# Altium PCB BMS042A_PCB.PcbDoc (part 4 of 5)
Units mil, origin at the board's own origin, x right, y up, seen from the top; angles counter-clockwise.
Board outline 4409.45 x 3307 mil, 6 copper layers (Top Layer, Layer 2 - PGND, Layer 3, Layer 4, Layer 5 - PGND, Bottom Layer), stack 60.8 mil thick; 273 components, 77 nets, 544 pads, 927 vias.
Unrouted connection lines stored in the file: 219.
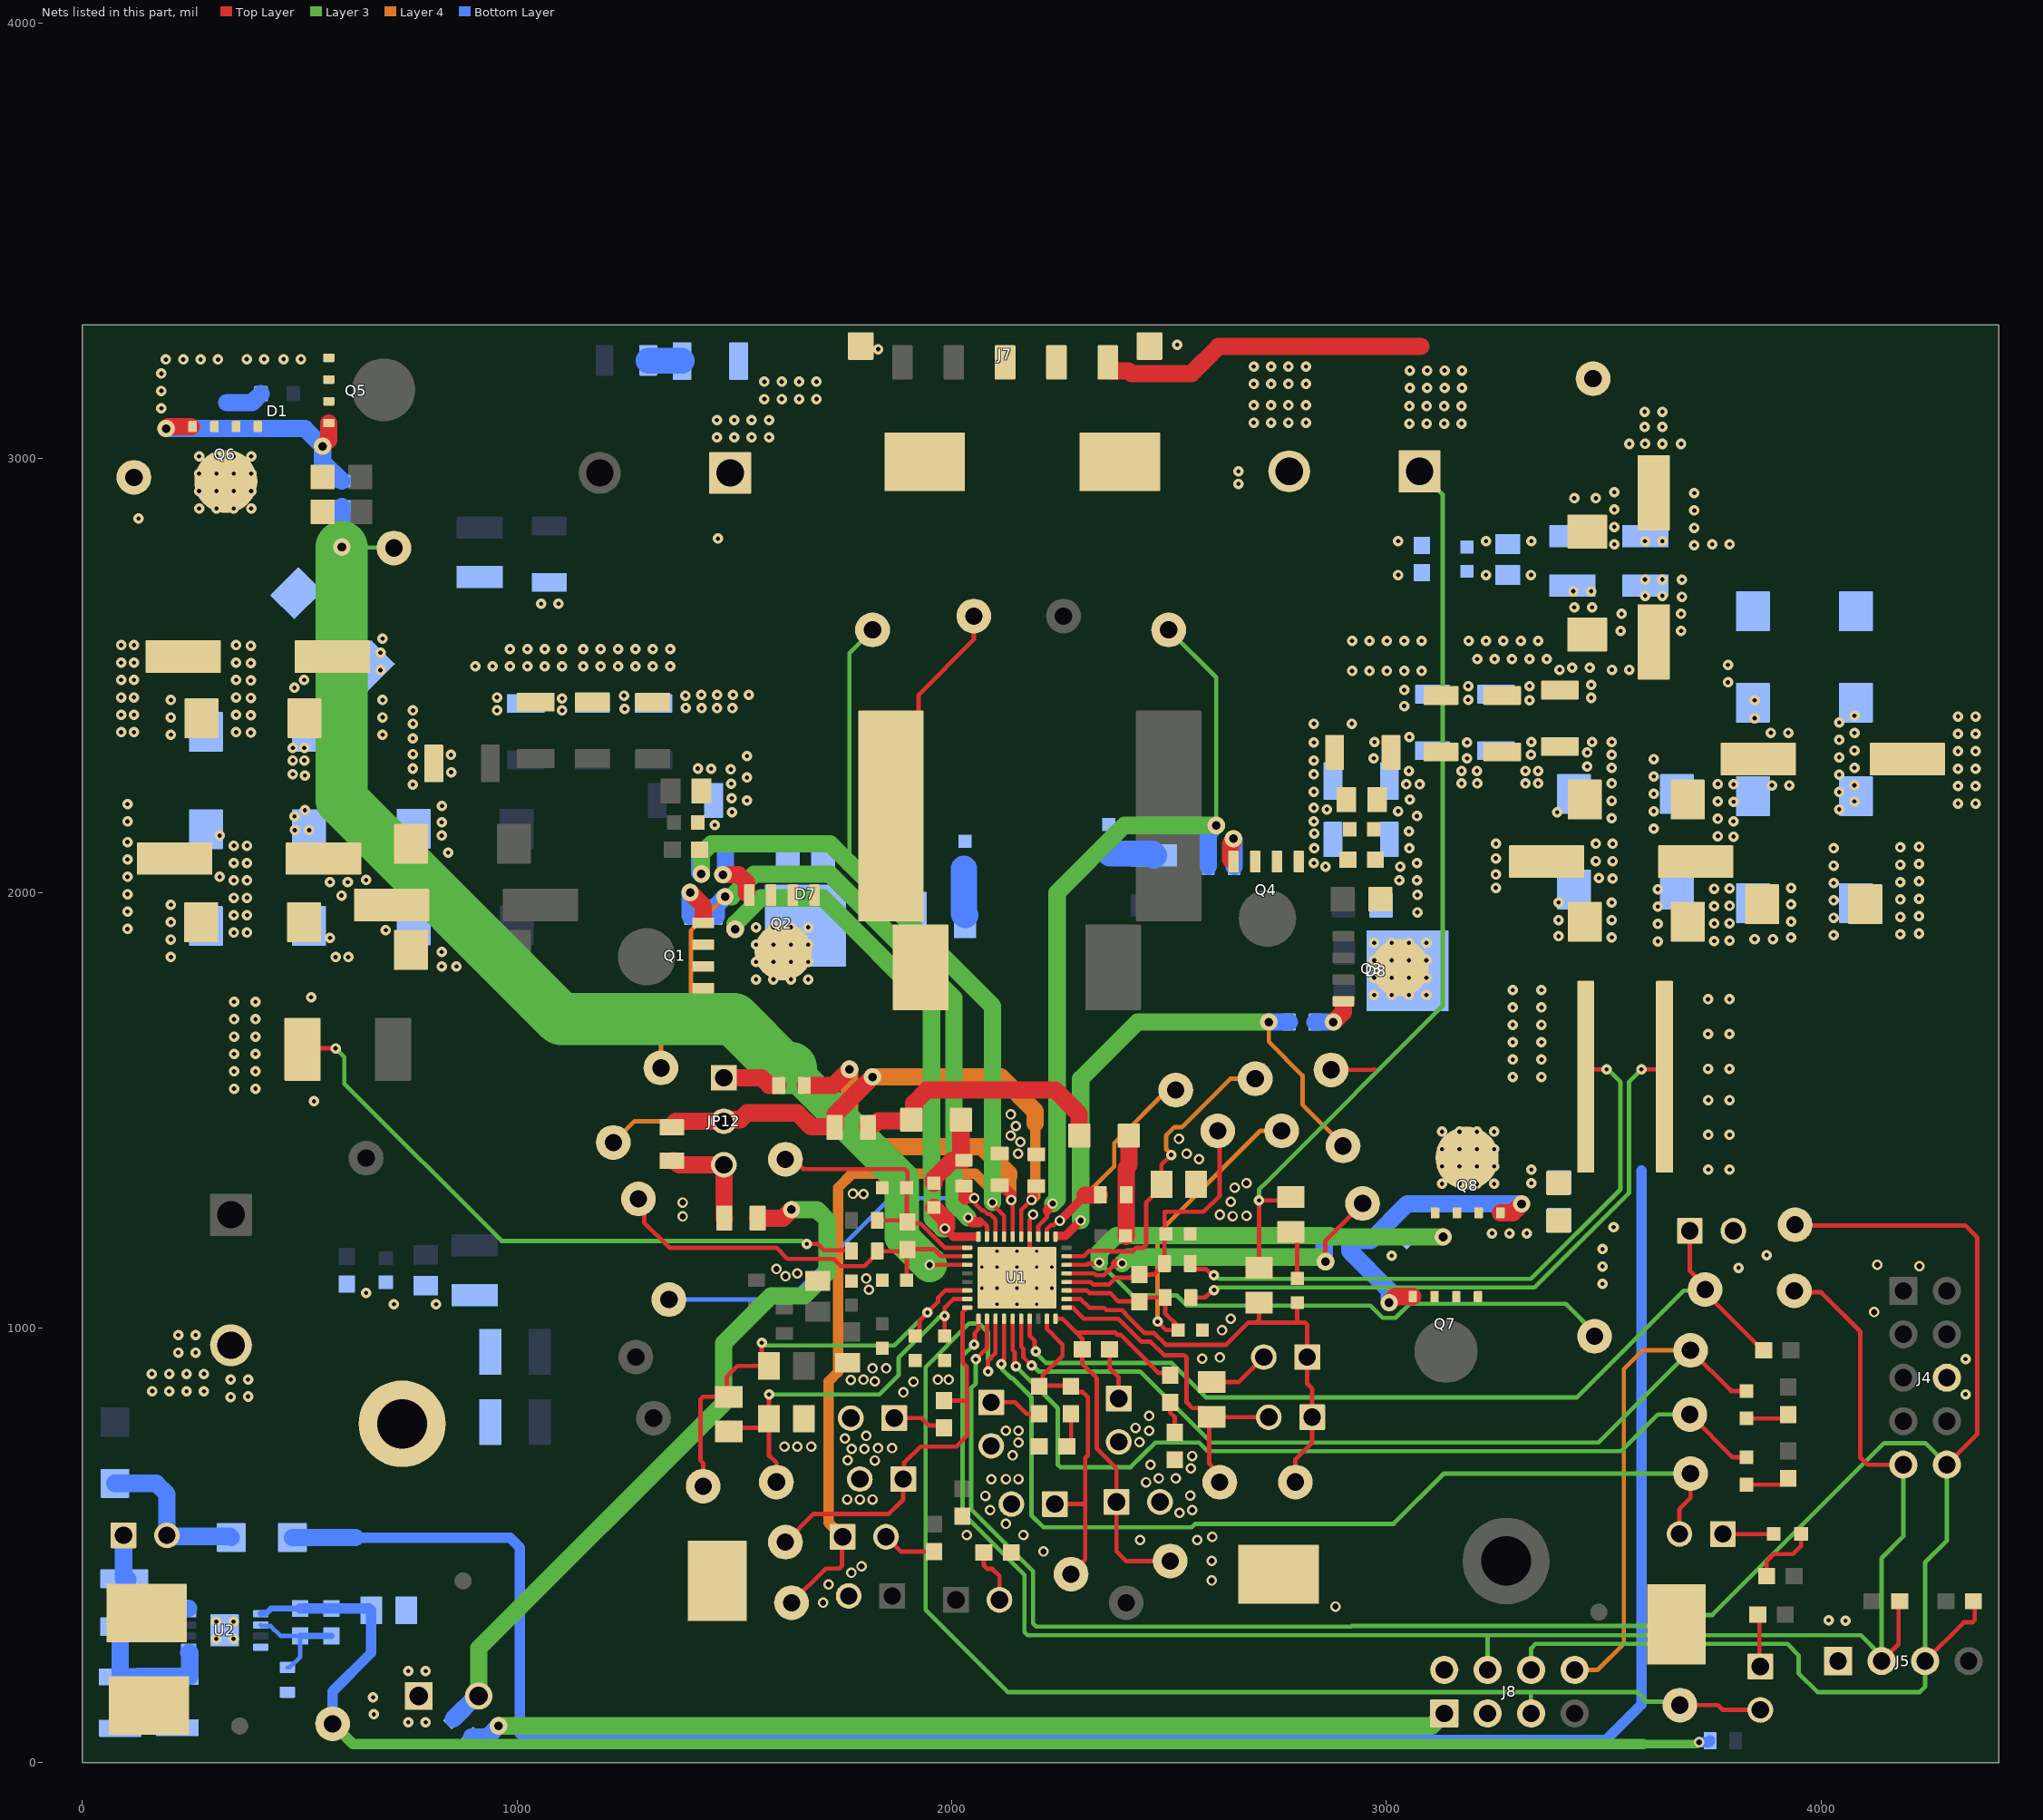
[diagram p6: the nets of this part, all layers, seen from the top]

## Via types
v1: diameter 24, hole 10, Top Layer to Bottom Layer, tented both sides, 653 vias
v2: diameter 24, hole 9.8, Top Layer to Bottom Layer, tented both sides, 132 vias
v3: diameter 24, hole 14, Top Layer to Bottom Layer, tented both sides, 105 vias
v4: diameter 40, hole 20, Top Layer to Bottom Layer, tented both sides, 21 vias
v5: diameter 19.68, hole 7.87, Top Layer to Bottom Layer, tented both sides, 16 vias

## Nets (pads, with @x,y where several pads share a name; then routed paths per layer and width w, separated by ;. In a path a pad name is that pad's centre, name@x,y a point inside that pad or via, vN(x,y) a via of type N, cw(c..) or ccw(c..) an arc to the next point about the centre after c; other vN are vias at no path point) (continued)
BTST2: (continued)
  Layer 4 w10: v3(2248.85,1246.42) 2249.46,1246.42 2373.81,1370.77 2373.81,1424.57 TP28.1@2506.82,1557.58
DRV_SUP: C26.1 JP12.2 R120.2 R300.2 TP15.1 U1.23 | length 1571
  Top Layer w9.84: U1.23@2159.86,1209.73 2159.86,1270.99 2183.12,1294.24 v3(2183.56,1294.24)
  Top Layer w10: R300.2@1362.06,1471.75 R300.2@1365.27,1468.54
  Top Layer w24: v3(2183.56,1294.24) 2185.94,1296.63 2185.94,1322.31 2189.69,1326.05 C26.1@2194.61,1326.05
  Top Layer w40: R300.2@1362.06,1471.75 1365.31,1475 JP12.2@1476,1475 1479.65,1478.65 1513.79,1478.65 1529.31,1494.16 1644.93,1494.16 1676.77,1462.32 1729.45,1462.32 1730.75,1461.02 R120.2@1730.75,1460.93 1732.05,1462.23 1732.05,1491.05 v4(1818,1577)
  Layer 4 w10: TP15.1@1221.64,1426.18 1270.46,1475 JP12.2@1476,1475
  Layer 4 w24: v3(2183.56,1294.24) 2192.08,1302.77 2192.08,1469.92
  Layer 4 w40: v4(1818,1577) 2113,1577 2192.08,1497.92 2192.08,1469.92
EXT_DRV: J6.2 R45.1 R68.2 | length 1729.9
  Top Layer w40: R45.1@1553.76,1252.02 1612,1252.02 v4(1631.64,1271.66)
  Layer 3 w40: J6.2@911.9,153 911.9,262.47 1475.63,826.2 1475.63,964.79 1583.9,1073.07 1660.07,1073.07 1713.85,1126.85 1713.85,1248.23 1690.42,1271.66 v4(1631.64,1271.66)
  Bottom Layer w40: R68.2@853.87,100.15 906.71,153 J6.2@911.9,153
FB: C25.2 JP1.1 JP2.1 R28.1 TP24.1 U1.12 | length 1122.4
  Top Layer w9.84: U1.12@2264.2,1066.03 2296.84,1066.03 2317.1,1045.77
  Top Layer w10: 2317.1,1045.77 2350.51,1045.77 2355.68,1040.6 2392.48,1040.6 2398.34,1034.74 2398.34,1033.7 2444.21,987.83 2465.59,987.83 2492.5,960.92 2631.11,960.92 2682.31,1012.12 2794.93,1012.12 ; 2702.18,1013.83 2707.04,1018.69 R28.1@2707.04,1058.12 ; TP24.1@2790.6,645.13 2790.6,697.14 2829.35,735.89 JP2.1@2829.35,794.25 2829.35,859.69 2817.87,871.17 JP1.1@2817.87,932.59 2817.87,1006.97 2812.72,1012.12 2794.93,1012.12 ; C25.2@2794.93,1057.69 2794.93,1012.12 ; JP1.1@2799.74,931.71 JP1.1@2802.24,929.21 ; JP2.1@2804.99,816.4 2806.24,815.15 JP2.1@2806.24,797.25 ; JP2.1@2811.21,797.25 JP2.1@2813.71,794.75
FBG: JP2.2 R64.1 TP42.1 U1.11 | length 796.8
  Top Layer w9.84: U1.11@2264.2,1046.35 2278.83,1046.35 2285.6,1039.58
  Top Layer w10: 2285.6,1039.56 2304.4,1020.76 2383.22,1020.76 2435.99,967.99 2457.37,967.99 2488.49,936.87 2534.41,936.87 2540.26,931.01 2540.26,828.53 2553.44,815.35 2577.98,815.35 R64.1@2597.98,795.35 ; TP42.1@2616.61,644.7 2616.61,663.64 2592.07,688.18 2592.07,789.45 R64.1@2597.98,795.35 ; JP2.2@2729.35,794.25 2608.43,794.25 2603.76,789.58 R64.1@2597.98,795.35
FSW_SYNC: JP8.1 R36.2 TP16.1 U1.36 | length 923.9
  Top Layer w9.84: 2024.89,994.22 2024.89,1035.39 U1.36@2035.85,1046.35
  Top Layer w10: TP16.1@1617.5,506.86 1682.64,572 1855.56,572 1888.66,605.1 JP8.1@1888.66,651.96 1890.37,653.67 1890.37,688.82 1928.31,726.76 2010.62,726.76 2035.13,751.27 2035.13,832.09 ; R36.2@1982.27,832.69 2034.53,832.69 2035.13,832.09 ; 2024.89,994.22 2024.89,920.35 2035.13,910.12 2035.13,832.09
HIDRV1: R8.2 TP25.1 U1.27 | length 1801.7
  Top Layer w9.84: 2062.87,1243.38 2065.72,1240.53 2075.36,1240.53 2081.12,1234.77 U1.27@2081.12,1209.73
  Top Layer w24: v3(2037.87,1253.04) 2047.53,1243.38 2062.87,1243.38
  Layer 3 w40: v4(1478.64,1991.46) 1493.85,1991.46 1545.57,2043.18 1720.01,2043.18 2005,1758.19 2005,1285.91 v3(2037.87,1253.04)
  Layer 4 w10: TP25.1@1334.8,1620.85 1344.61,1611.04 TP25.1@1331.21,1597.65 1331.21,1674.62 1400.23,1743.63 1400.23,1913.04 v4(1478.64,1991.46)
  Bottom Layer w40: R8.2@1458.05,1946.44 1458.05,1970.87 v4(1478.64,1991.46)
HIDRV2: R3.2 TP27.1 U1.19 | length 1283
  Top Layer w20: 2243.68,1211.54 2261.63,1211.54 v3(2296.71,1246.62)
  Layer 3 w40: v3(2296.71,1246.62) 2296.71,1572.35 2427.36,1703 v4(2729.35,1703)
  Layer 4 w10: v4(2729.35,1703) 2729.35,1657.76 2807,1580.12 2807,1513 2900.2,1419.8 TP27.1@2900.2,1418.18
  Bottom Layer w40: v4(2729.35,1703) R3.2@2776.71,1703
ICHG: JP3.1 R67.2 R201.2 TP17.1 U1.9 | length 818.6
  Top Layer w9.84: U1.9@2218.92,1020.76 2218.92,998.13 2233.95,983.1
  Top Layer w10: 2233.95,983.1 2233.95,982.56 2254.86,961.65 2254.86,935.65 2209.39,890.18 2209.39,880.55 2195.69,866.85 2268.04,866.85 R201.2@2268.04,865.87 ; JP3.1@2237.34,594.5 2306.98,594.5 2307.09,594.4 ; R201.2@2274.6,865.44 2287.57,852.47 2301.23,852.47 2313.22,840.48 2313.22,706.32 2307.09,700.18 2307.09,594.4 ; TP17.1@2284.51,433.15 TP17.1@2274.6,433.15 2274.6,434.6 2306.98,466.98 2306.98,478.33 2307.09,478.44 2307.09,594.4
ILIM_HIZ: JP11.1 R66.2 R200.2 TP7.1 U1.10 | length 992.6
  Top Layer w9.84: U1.10@2238.6,1020.76 2254.86,1020.76
  Top Layer w10: 2254.86,1020.76 2286.93,988.68 ; R200.2@2501.47,890.18 R200.2@2502.47,891.19 2497.61,896.05 2476.55,896.05 2428.93,943.67 2389.09,983.5 2381.65,983.5 2376.48,988.68 2286.93,988.68 ; TP7.1@2502.47,463.57 2401.38,463.57 2379.24,485.7 JP11.1@2379.24,599.34 2379.24,676.35 2333.89,721.7 2333.89,883.96 2300.27,917.58 R66.2@2300.27,949.96 2300.27,975.34 2286.93,988.68
LODRV1: R20.1 TP43.1 U1.25 | length 2033.8
  Top Layer w9.84: U1.25@2120.49,1209.73 2120.49,1257.45
  Top Layer w10: v3(2093.81,1288.14) 2093.81,1284.35 2100.81,1277.35 2100.81,1277.02 2120.38,1257.45
  Layer 3 w10: 1764.67,2069.01 1764.67,2551.86 TP43.1@1818,2605.19
  Layer 3 w40: v4(1424.04,2043.72) 1424.04,2090.09 1447.47,2113.52 1720.16,2113.52 1764.67,2069.01 2093.81,1739.87 v3(2093.81,1288.14)
  Bottom Layer w40: R20.1@1420.47,2096 1420.47,2047.28 v4(1424.04,2043.72)
LODRV2: R17.1 TP44.1 U1.21 | length 1835.6
  Top Layer w9.84: U1.21@2199.23,1209.73 2199.23,1234.66 2219.18,1254.6 2219.18,1268.14
  Top Layer w20: 2219.18,1268.14 2219.18,1271.35 2232.49,1284.66 v3(2232.49,1285.74)
  Layer 3 w10: TP44.1@2499.14,2605.19 2608.41,2495.91 v4(2608.41,2155.29)
  Layer 3 w40: v3(2232.49,1285.74) 2242.49,1295.74 2242.49,2000.67 2397.1,2155.29 v4(2608.41,2155.29)
  Bottom Layer w40: R17.1@2590.44,2061.1 2590.44,2137.31 v4(2608.41,2155.29)
MODE: R32.2 TP20.1 U1.17 | length 744.7
  Top Layer w9.84: U1.17@2264.2,1164.46 2280.97,1164.46 2303.73,1164.46 2316.29,1177.02 2365.29,1177.02 2366.82,1175.49 2415.82,1175.49 2424.47,1184.14 2441.09,1184.14
  Top Layer w10: 2441.09,1184.14 2447.19,1190.24 2447.19,1288.19 2482.5,1323.5 R32.2@2482.5,1330 2482.5,1375 v1(2505,1397.5)
  Layer 4 w10: v1(2505,1397.5) 2505,1398.81 2493.45,1410.36 2493.45,1443.22 2511.38,1461.16 2529.07,1461.16 2640.75,1572.84 TP20.1@2698.25,1572.84 ; TP20.1@2711.17,1596.51 TP20.1@2717.96,1603.3
NetC9_1: C9.1 D1.1 Q5.1 Q5.2 Q5.3 Q6.1 Q6.2 Q6.3 | length 86.5
  Bottom Layer w40: C9.1@333,3128 390.78,3128 D1.1@411.09,3148.31
  other v1: 182,3115 182,3155 182,3195 192.54,3227.16 232.54,3227.16 272.54,3227.16 312.54,3227.16 378.32,3228 418.32,3228 463.16,3228 503.16,3228
NetC9_2: C9.2 D1.3 Q5.4 Q6.4 R12.2 | length 594
  Top Layer w40: v4(193,3068.28) 197.69,3072.97 Q6.4@250.46,3072.97 ; v4(553.08,3027.53) 567.32,3041.77 Q5.4@567.32,3080.97
  Bottom Layer w40: v4(193,3068.28) 512.34,3068.28 v4(553.08,3027.53) 553.08,2991.66 R12.2@597.22,2947.53
NetC12_2: C12.2 D3.1 R13.2 | length 193.2
  Top Layer w40: C12.2@1958.93,1332.66 1958.93,1342.75 1988.46,1372.27 2001.4,1385.21 R13.2@2028.2,1385.21 2021.36,1392.05 D3.1@2021.36,1478.65
NetC13_1: C13.1 R10.1 | length 75.8
  Bottom Layer w60: R10.1@1303.02,3224.42 C13.1@1378.86,3224.42
NetC14_1: C14.1 R14.1 | length 108.4
  Bottom Layer w60: C14.1@2028.15,2056.17 2028.15,1951.93 R14.1@2031.09,1949
NetC15_1: C15.1 R15.1 | length 109.7
  Bottom Layer w60: C15.1@2359.78,2095.5 2364.7,2090.58 2461.18,2090.58 R15.1@2465.59,2086.18
NetC18_1: C18.1 D2.1 R23.2 | length 237
  Top Layer w24: C18.1@2399.65,1212.02 C18.1@2401.42,1210.25
  Top Layer w40: C18.1@2401.42,1210.25 2401.42,1367.7 2407.6,1373.88 D2.1@2407.6,1442.17
NetC25_1: C25.1 R59.1 | length 113
  Top Layer w10: R59.1@2780.2,1220.61 2794.93,1205.88 C25.1@2794.93,1113.69
NetC33_2: C33.2 C49.2 R46.2 U2.5 U2.8 | length 507.7
  Bottom Layer w40: R46.2@87.51,310.73 C33.2@87.51,196.95 87.82,197.27 127.73,197.27 128.59,198.13 C49.2@218.68,198.13 247.19,198.13 247.5,198.44 247.5,252.5 247.12,252.88 244.73,252.88 ; R46.2@96.65,312.38 98.31,310.73 165.14,310.73 189.56,335.15 189.56,351.09 193.16,354.69 244.73,354.69
NetC36_1: C36.1 Q7.4 Q8.4 R9.1 | length 728.8
  Top Layer w40: v4(3006.07,1057.76) 3020.24,1071.93 Q7.4@3060.7,1071.93 ; Q8.4@3262,1264.46 3290.46,1264.46 v4(3311,1285)
  Bottom Layer w40: v4(3006.07,1057.76) 3006.07,1086.57 2915.79,1176.85 R9.1@2915.79,1201.2 2964.02,1201.2 3047.82,1285 v4(3311,1285)
NetC50_2: C50.2 R48.1 R49.2 U2.2 | length 261.3
  Bottom Layer w10: U2.2@410.51,316.58 412.99,314.1 433.4,314.1 456.12,291.38 R48.1@501.51,291.38 501.51,243.2 477.03,218.72 R49.2@472.11,218.72
  Bottom Layer w14: R48.1@501.51,291.38 C50.2@573.69,291.38
NetC201_1: C201.1 R201.1 | length 79.9
  Top Layer w10: C201.1@2264.53,726.76 2274.6,736.82 R201.1@2274.6,802.45
NetC202_1: C202.1 R200.1 | length 73.2
  Top Layer w10: R200.1@2502.47,828.2 2502.47,804.99 2513.26,794.2 C202.1@2513.26,759.46
NetD2_2: D2.2 D3.2 R120.1 | length 614.8
  Top Layer w40: R120.1@1807.52,1460.93 1807.52,1468.18 1808.82,1469.48 1824.17,1469.48 1830.95,1476.26 D3.2@1903.01,1476.26 ; D3.2@1905.22,1478.65 1912.78,1486.21 1912.78,1516.42 1943.03,1546.68 2238.12,1546.68 2293.01,1491.79 2293.01,1447.33 D2.2@2298.6,1441.74
NetD4_1: D4.1 JP15.1 | length 127.5
  Top Layer w10: JP15.1@3774,525.56 D4.1@3890.91,525.56 D4.1@3898.4,533.05
NetD4_2: D4.2 R50.1 | length 155.1
  Top Layer w10: R50.1@3874.55,429 3874.55,462.5 3891.41,479.36 3935.25,479.36 3953.9,498.01 D4.2@3953.9,525.56
NetD5_2: D5.2 R51.1 | length 116.7
  Top Layer w10: D5.2@3828,639.01 3910.86,639.01 3924.56,652.71 R51.1@3924.56,653.6 ; R51.1@3928.67,649.49 R51.1@3938.26,659.08
NetD6_2: D6.2 R52.1 | length 99.7
  Top Layer w10: D6.2@3828,791.5 3915,791.5 R52.1@3924,800.5
NetD9_1: D9.1 D10.1 JP16.2 | length 374.7
  Bottom Layer w40: D10.1@75,642.03 170.47,642.03 195,617.5 JP16.2@195,522.5 197.5,520 340,520 D9.1@342.5,517.5
NetJP1_2: JP1.2 R64.2 | length 143.6
  Top Layer w10: R64.2@2597.98,875.35 2660.63,875.35 JP1.2@2717.87,932.59
NetJP4_1: JP4.1 R67.1 | length 121.9
  Top Layer w10: JP4.1@2090.97,828.29 2091.67,829 2145.06,829 2171.61,802.45 R67.1@2201.54,802.45
NetJP5_2: JP5.2 R34.2 | length 120.6
  Top Layer w10: JP5.2@1849.03,519.15 1882.85,485.33 R34.2@1955.63,485.33
NetJP6_2: JP6.2 R41.2 | length 140.4
  Top Layer w10: R41.2@2069.16,492.53 R41.2@2069.68,492 ; R41.2@2071.81,480.68 R41.2@2074.23,483.1 2074.23,452.87 2081.73,445.38 2093.81,445.38 2109.85,429.33 JP6.2@2109.85,374.06 ; JP6.2@2092.46,375.31 JP6.2@2096.22,379.07
NetJP9_1: JP9.1 R36.1 | length 125.2
  Top Layer w10: JP9.1@1868,792.25 1930.93,792.25 1948.26,774.91 1977.06,774.91 R36.1@1982.27,769.7 ; R36.1@1992.27,774.91 R36.1@1993.38,776.02
NetJP10_1: JP10.1 R66.1 | length 115.1
  Top Layer w10: R66.1@2363.26,943.64 2363.26,906.64 2383.92,885.98 2383.92,837.74 JP10.1@2384.34,837.31
NetJP12_1: JP12.1 R160.2 | length 131.4
  Top Layer w40: JP12.1@1476,1575 1562.61,1575 1580.03,1557.58 R160.2@1600.14,1557.58
NetJP12_3: JP12.3 R45.2 R300.1 | length 251.9
  Top Layer w40: R300.1@1356.46,1384.16 1363.7,1384.16 1372.87,1375 JP12.3@1476,1375 1476.49,1374.51 1476.49,1252.51 R45.2@1476.98,1252.02 ; JP12.3@1473.85,1378.65 JP12.3@1477.5,1375
NetJP14_1: JP14.1 R55.1 | length 102.4
  Top Layer w10: R55.1@3854.5,340 3858,336.5 JP14.1@3858,239
NetJP16_1: JP16.1 R46.1 | length 108.9
  Bottom Layer w40: R46.1@95,422.62 JP16.1@95,522.5 ; R46.1@96.65,422.62 103.33,422.62 R46.1@104.98,420.96
NetQ1_4: Q1.4 R8.1 | length 127.3
  Top Layer w40: v4(1398.39,2000.98) 1405.49,1993.87 1428.75,1970.62 1428.75,1941.45 Q1.4@1429.02,1941.19
  Bottom Layer w40: v4(1398.39,2000.98) 1398.39,1947.04 R8.1@1398.99,1946.44
NetQ2_4: Q2.4 R20.2 | length 142
  Top Layer w40: v4(1473.85,2041.95) 1510.05,2041.95 1528.01,2024 Q2.4@1528.01,1999.99
  Bottom Layer w40: v4(1473.85,2041.95) 1479.53,2047.63 R20.2@1479.53,2096
NetQ3_4: Q3.4 R3.1 | length 88.3
  Top Layer w40: v4(2877.96,1703) 2900.8,1725.84 2900.8,1739.26 Q3.4@2901.07,1738.98
  Bottom Layer w40: R3.1@2835.76,1703 v4(2877.96,1703)
NetQ4_4: Q4.4 R17.2 | length 115
  Top Layer w40: Q4.4@2641.35,2077.26 2641.35,2113.37 2648,2120.02 v4(2648,2125)
  Bottom Layer w40: v4(2648,2125) 2649.5,2123.5 R17.2@2649.5,2061.1
P_OUT: C17.1 C28.2 C29.2 C40.2 C45.2 C46.2 C53.2 C54.2 C56.2 C57.2 C82.1 C152.1 C504.2 C505.2 C514.2 C515.2 D8.3 Q3.5-6-7-8 Q8.5-6-7-8 R22.1 R24.2 R1002.2 R1003.2 R1004.1 R1005.1 TP41.1 | length 1539.1
  Top Layer w10: R22.1@2548.68,1147.83 2548.68,1144.83 2558.44,1135.06 2584.68,1135.06 2599.03,1120.71 v1(2602.82,1120.71) ; TP41.1@2872.64,1593.12 2970.66,1593.12 2972.49,1594.96 ; R24.2@3458.48,1577.28 3458.48,1579.45 3473.17,1594.14 v1(3506.49,1594.14)
  Layer 3 w10: v1(2602.82,1120.71) 2606.61,1120.71 2614.87,1112.45 3332.47,1112.45 3538.55,1318.53 3538.55,1564.91 3509.32,1594.14 v1(3506.49,1594.14)
  other v1: 3333.28,1332.36 3333.29,1363.83 3290.46,1576.89 3356.57,1576.89 3290.46,1616.89 3356.57,1616.89 3290.46,1656.89 3356.57,1656.89 3290.46,1696.89 3356.57,1696.89 3290.46,1736.89 3356.57,1736.89 3290.46,1776.89 3356.57,1776.89 3518.25,1897.97 3395.91,1900.65 3395.91,1937.97 3518.25,1937.97 3071.37,1955.64 3395.91,1977.97 3518.25,1977.97 3071.37,1995.64 3251.56,2011.79 3029.52,2029.05 3070.07,2029.05 3520.46,2033.37 3488.81,2034.61 3251.56,2042.39 3031.48,2061 3070.07,2069.05 3481.96,2073.37 3520.46,2073.37 3251.56,2079.72 3052.82,2103 3252.16,2113.37 3481.96,2113.37 3520.46,2113.37 3051.69,2141.75 3518.25,2172 3070.07,2176.98 3392.97,2185.8 3027,2188.04 3518.25,2212 3053.82,2214.91 3045.97,2249.86 3076.42,2249.86 3172.82,2252.04 3209,2252 3320,2252.04 3349.08,2252 3518.25,2252 3051.93,2281 3172.82,2281 3208.14,2281 3320,2281 3349.08,2281 3518.25,2288 3462.09,2291 2970.78,2309.84 3185.59,2309.84 3332.78,2317.94 3518.25,2317.94 3462.09,2322.94 3185.59,2346.27 2972.49,2347.31 3333.29,2347.31 3473.17,2347.31 3518.25,2347.31 3052.82,2359
  other v2: 3128.14,1331.02 3168.14,1331.02 3208.14,1331.02 3248.14,1331.02 3128.14,1371.02 3168.14,1371.02 3208.14,1371.02 3248.14,1371.02 3128.14,1411.02 3168.14,1411.02 3208.14,1411.02 3248.14,1411.02 3128.14,1451.02 3168.14,1451.02 3208.14,1451.02 3248.14,1451.02 2971.93,1765.31 3011.93,1765.31 3051.93,1765.31 3091.93,1765.31 2971.93,1805.31 3011.93,1805.31 3051.93,1805.31 3091.93,1805.31 2971.93,1845.31 3011.93,1845.31 3051.93,1845.31 3091.93,1845.31 2971.93,1885.31 3011.93,1885.31 3051.93,1885.31 3091.93,1885.31
PGND: C2.1 C3.2 C4.2 C5.1 C6.2 C7.1 C8.1 C10.2 C11.2 C13.2 C14.2 C15.2 C16.2 C17.2 C19.2 C20.2 C21.2 C22.2 C23.2 C24.2 C26.2 C28.1 C29.1 C31.2 C32.2 C33.1 C38.1 C39.1 C40.1 C42.1 C43.2 C44.1 C45.1 C46.1 C48.2 C49.1 C53.1 C54.1 C56.1 C57.1 C60.2 C63.2 C70.1 C74.2 C77.2 C78.2 C80.2 C81.2 C82.2 C150.1 C151.2 C152.2 C200.2 C201.2 C202.2 C500.1 C501.1 C502.1 C503.1 C504.1 C505.1 C506.1 C507.1 C508.1 C509.1 C510.1 C511.1 C512.1 C513.1 C514.1 C515.1 C516.1 C517.1 C518.1 C519.1 D7.1 D7.2 J1.1 J2.2 J3.2 J4.6 J5.1 J6.1 J7.2 J7.3 J7.6 J7.7 J8.2 J8.3 JP3.2 JP4.2 JP7.2 JP8.2 JP9.2 JP10.2 JP11.2 JP13.2 pad.Pad2 Q2.1 Q2.2 Q2.3 Q4.1 Q4.2 Q4.3 R30.1 R32.1 R41.1 R49.1 R65.1 R151.1 R152.1 R153.1 R154.1 R400.1 R401.1 TP35.1 TP36.1 TP37.1 TP38.1 TP39.1 TP40.1 TP47.1 U1.22 U1.37 U2.4 U2.9 | length 160.8
  Top Layer w9.84: U1.37@2150.02,1115.24 2179.55,1144.77 U1.22@2179.55,1209.73 2179.55,1222.92 2179.55,1248.99 2187.34,1256.78 v3(2187.34,1260.61)
  other v1: 750.05,92.49 790.05,92.49 671,111 669,150 750.1,210.57 790.1,210.57 4056,326.08 4017.24,327.17 341.68,840.79 381.44,841.87 4332,846.95 161.08,854.25 200,854 240,854 280,854 341.68,880.79 381.68,880.79 160,894 200,894 240,894 280,894 4332,928 221,943 261,943 221,983 261,983 717,1054.17 814,1054.17 653.17,1080.32 3810,1138 3874.55,1167.22 827,1831 861,1831 582.78,1852.53 612.13,1852.53 827,1864.58 3624.5,1888.79 3753.98,1889.68 3789.5,1890.51 3847,1894 3889,1894 570,1896.85 3930.5,1897.97 698.26,1914.53 3624.5,1928.79 3753.98,1929.68 3789.5,1930.51 3931,1933.91 3624.5,1968.79 3753.98,1969.68 3789.5,1970.51 3930.5,1974 596.39,1994.15 3624.5,2008.79 3753.98,2009.68 3789.5,2010.51 3931,2011.79 570,2025 610.82,2025 653,2030 2860,2061 2833,2069.05 841.94,2092.91 2834.08,2103 3798.51,2129.84 3762.51,2130.65 827,2132 2834.08,2136.9 489,2144.58 522,2144.58 3614.74,2148.04 1455.2,2156.57 827,2162.53 2833,2165 3798,2165 3762.51,2170.65 488.17,2176.43 1494.53,2185.92 3614.74,2188.04 512.32,2190.47 2863.18,2192.2 2833,2195.61 827.58,2200.38 3798.51,2209.84 3762.51,2210.65 1529.29,2212.75 1493.98,2218.09 3614.74,2228.04 2833,2232.93 3886.84,2247.57 3926.84,2247.57 760.44,2249.13 3798.51,2249.84 1493.11,2251.26 3762.51,2250.65 1529.29,2265.72 3614.74,2268.04 512.32,2270.36 484.51,2273.46 2833,2272.93 848.89,2277.82 1491.86,2284.37 760.44,2286.31 1416.24,2286.31 1446.83,2285.7 2833,2304.47 484.51,2304.97 510.85,2304.97 3614.74,2308.04 1529.29,2314.98 848.11,2317.69 760.95,2319.56 484.51,2333.64 510.85,2333.64 2833,2346.27 760.44,2355.79 691,2364 3884.42,2368.57 3924.42,2368.57 760.95,2389.33 2920.19,2389.31 2833,2389.53 3847,2402 691,2404 760.95,2420 954,2420 1103.95,2420 1247.74,2423.43 1424.91,2425.23 1460.21,2425.23 1495.51,2425.23 1388.41,2425.79 3041,2430 3329,2443.4 3847,2443.4 691,2444 3188,2444.51 1103.95,2447.39 3470.86,2449.01 954,2450 1246,2454 1387.59,2454 1424.11,2456 1460.57,2456 1497.03,2456 1533.48,2456 3041.1,2466.96 488.17,2472 3188,2476 3329,2476 3471.04,2478.67 3785.5,2484.51 510.5,2490 2921.1,2510.73 2961.1,2510.73 3001.1,2510.73 3041.1,2510.73 3081.1,2510.73 686.02,2512.81 3398.51,2513.5 3518.51,2513.5 3558.51,2513.5 3427.43,2518.5 3467.43,2518.5 903.95,2521.32 943.95,2521.32 983.95,2521.32 1023.95,2521.32 1063.95,2521.32 1103.95,2521.32 1152.48,2521.32 1192.48,2521.32 1232.48,2521.32 1272.48,2521.32 1312.48,2521.32 1352.48,2521.32 3785.5,2524.51 3209,2538 3249,2538 3289,2538 3329,2538 3369,2538 686.02,2552.81 983.95,2561.32 1023.95,2561.32 1063.95,2561.32 1103.95,2561.32 1152.48,2561.32 1192.48,2561.32 1232.48,2561.32 1272.48,2561.32 1312.48,2561.32 1352.48,2561.32 2921.1,2579.72 2961.1,2579.72 3001.1,2579.72 3041.1,2579.72 3081.1,2579.72 3189.08,2579.72 3229.08,2579.72 3269.08,2579.72 3309.08,2579.72 3349.08,2579.72 691,2585 3539,2603 3678,2603 3541,2642 3678,2642 3432,2657 3473.17,2657 1055.62,2665.32 1095.62,2665.32 3680,2681.49 3595.35,2683.62 3634.69,2683.62 3430,2694 3470.86,2694 3680,2720.49 3594.69,2721 3634.69,2721 3027,2731.57 3229.08,2731.57 3332.78,2731.57 1462.34,2815.25 2659.52,2940.97 2659.52,2970.06 1460,3048 1500,3048 1540,3048 1580,3048 2694.82,3081.91 2734.82,3081.91 2774.82,3081.91 2814.82,3081.91 1460,3088 1500,3088 1540,3088 1580,3088 2694.82,3121.91 2734.82,3121.91 2774.82,3121.91 2814.82,3121.91 1569,3136 1609,3136 1649,3136 1689,3136 2694.82,3170.91 2734.82,3170.91 2774.82,3170.91 2814.82,3170.91 1569,3176 1609,3176 1649,3176 1689,3176 2694.82,3210.91 2734.82,3210.91 2774.82,3210.91 2814.82,3210.91 1830.82,3250.91 2518.82,3260.91
  other v2: 308.19,284.31 348.19,284.31 308.19,324.31 348.19,324.31
  other v3: 2882.74,358.87 1704.41,367.5 1716.92,409.78 2597.98,418.52 1769.3,436.3 1792.67,451.42 2597.98,463.57 2211.07,485.33 2433.21,512 2564.88,512 2599.5,519.15 2034.6,523.55 2164.79,523.55 2124.67,548.91 2524.02,574.42 2088.5,580.52 2553.44,580.52 1759.53,605.1 1788.66,605.1 1818,605.1 2077.22,613.32 2548.68,613.71 2447.19,644.7 2090.97,651.52 2125.05,651.96 2153.51,651.96 2476.55,653.67 2515.4,653.67 2550.21,676.35 2457.37,685.1 1823.49,694.66 1760.8,695.54 2553.44,705.17 2140.18,706.32 1769.89,721.7 1799.03,721.7 1830.81,723 1863.1,723 1615.29,726.76 1644.93,726.76 1676.77,726.76 2153.51,735.89 2431.88,737.31 1754.48,745.53 1803.19,751.27 2124.67,762.9 2153.51,762.9 2454.03,762.9 2423,769.84 2454.03,797.25 1888.66,851.36 1912.24,875.99 1823.49,876.92 1768,879.91 1797.33,880.55 1967.91,880.55 1993.38,880.55 1818,906.64 1849.03,906.64 2576.24,929.21 2616.61,931.71 2621.69,994.22 2641.73,1020.76 4122,1036 1809.59,1087.65 1803.19,1113.23 1617.48,1118.41 1644.93,1125.01 1596.8,1135.06 4226,1142 4129,1145 1381.49,1255.94 2646.54,1256.78 2677.99,1257.45 2616.61,1260.09 1381.49,1288.14 2641.73,1289.63 1797.33,1307.31 1772.65,1308.11 2650.9,1321.99 2677.99,1332.66 2568.99,1387.84 2152.65,1400.63 2540.26,1400.63 2158.24,1427.19 2522.5,1434.31 2135.72,1442.12 2147.82,1463.96 2135.65,1490.64
  other v5: 2104.35,1054.22 2150.02,1054.22 2195.69,1054.22 2069.31,1091.03 2104.35,1091.03 2150.02,1091.03 2195.69,1091.03 2230.73,1091.03 2069.31,1139.46 2104.35,1139.46 2150.02,1139.46 2195.69,1139.46 2230.73,1139.46 2104.35,1176.27 2150.02,1176.27 2195.69,1176.27
PP5V: J8.1 R68.1 | length 2260
  Layer 3 w40: v4(957.5,84.29) 3104.29,84.29 J8.1@3133,113
  Bottom Layer w40: R68.1@895.63,58.4 931.6,58.4 v4(957.5,84.29)
REGN: C22.1 JP5.1 R160.1 TP1.1 U1.24 | length 2321.4
  Top Layer w9.84: v3(2137.23,1293.82) 2137.23,1289.99 2140.18,1287.04 U1.24@2140.18,1209.73
  Top Layer w10: TP1.1@1631.64,367.5 1710.2,446.06 1741.6,446.06 1747.46,451.92 1747.46,517.58 JP5.1@1749.03,519.15
  Top Layer w24: C22.1@2110.65,1327.79 2115.57,1327.79 2137.23,1306.14 v3(2137.23,1293.82)
  Top Layer w40: R160.1@1663.13,1557.58 1728.09,1557.58 v4(1764.67,1594.16)
  Layer 4 w24: JP5.1@1749.03,519.15 1716.74,551.44 1716.74,737.02 1716.63,737.13 1716.63,876.4 1738.4,898.17 1738.4,1321.72 1771.15,1354.46 2054.22,1354.46 2086.7,1321.99 2129.61,1321.99 2137.23,1329.6 ; 2131.55,1348.79 2137.23,1343.11 2137.23,1329.6 ; v3@2135.99,1293.82 v3(2137.23,1293.82) 2137.23,1329.6
  Layer 4 w40: v4(1764.67,1594.16) 1764.67,1477.33 1825.41,1416.59 2069.42,1416.59 2131.55,1354.46 2131.55,1348.79
SCL: J4.9 J5.2 J8.4 R53.1 TP33.1 U1.1 | length 4075.8
  Top Layer w9.84: v1(2051.73,961.66) 2053.22,963.14 2053.22,988.42 2061.44,996.64 U1.1@2061.44,1020.76
  Top Layer w10: TP33.1@3938.26,1085.1 3941.84,1081.52 4000.02,1081.52 4090,991.53 4090,702 4106.9,685.1 J4.9@4189,685.1 J4.9@4183.9,680 ; J5.2@4139,233.41 4178,272.41 R53.1@4178,369.9
  Layer 3 w10: v1(2051.73,961.66) 2051.62,961.66 2024.89,934.92 2024.89,574.38 2167.5,431.77 2167.5,300.02 2174.7,292.82 3233,292.82 ; J8.4@3233,213 3233,292.82 ; J4.9@4189,685.1 4189,520.11 4139.01,470.12 4139.01,245 4091.2,292.82 3233,292.82
SDA: J4.10 J5.3 J8.6 R54.1 TP34.1 U1.2 | length 5807.2
  Top Layer w9.84: v1(2055.51,927.58) 2077.04,949.12 2081.12,953.2 2081.12,1012.14 U1.2@2081.12,1020.76
  Top Layer w10: TP34.1@3942,1235 4332,1235 4359,1208 4359,755.1 J4.10@4289,685.1 ; J5.3@4239,233.41 4327.97,322.37 4347.64,322.37 4353.5,328.23 R54.1@4353.5,371
  Layer 3 w10: v1(2055.51,927.58) 2055.51,871.67 2044.73,860.89 2044.73,582.6 2187.34,439.99 2187.34,319.87 2194.55,312.66 2919.44,312.66 2920.79,314.01 3645.69,314.01 3671.02,339.34 3749.75,339.34 4145,734.6 4239.5,734.6 J4.10@4289,685.1 4289,510.12 4239.01,460.13 J5.3@4239.01,245 ; J8.6@3333,213 3333,262.91 3343.06,272.97 3922.14,272.97 3948.08,247.04 3948.08,205.28 3991.36,162 4226.92,162 4239,174.08 J5.3@4239,233.41
SRN: C23.1 C35.2 R25.2 TP23.1 U1.13 | length 962.9
  Top Layer w9.84: U1.13@2264.2,1085.72 2311.14,1085.72 2311.22,1085.64
  Top Layer w10: 2311.22,1085.64 2317.1,1079.76 2364.22,1079.76 2383.38,1060.6 2419.96,1060.6 2429.24,1069.88 R25.2@2491.15,1069.88 2491.15,1033.59 C23.1@2522.67,1002.07 ; v1(2473.69,1014.15) 2493.08,994.76 C23.1@2520.68,994.76
  Layer 4 w10: v1(2473.69,1014.15) 2473.69,1217.09 2709.64,1453.04 2758.67,1453.04 TP23.1@2758.79,1452.92
SRP: C21.1 C35.1 R22.2 TP22.1 U1.14 | length 699.3
  Top Layer w9.84: U1.14@2264.2,1105.4 2319.41,1105.4 2325.27,1099.54
  Top Layer w10: 2325.32,1099.6 2362.37,1099.6 2378.02,1115.24 2411.61,1115.24 C35.1@2419.96,1123.59 ; C35.1@2431.88,1122.53 2465.93,1122.53 2476.55,1133.14 2479.86,1133.14 2489.63,1142.91 R22.2@2489.63,1147.83 2489.63,1213.01 C21.1@2492.68,1216.07 2489.63,1219.12 2489.63,1266.69 2579.46,1266.69 2616.61,1303.84 2616.61,1416.62 2598.13,1435.11 TP22.1@2598.13,1448.26 ; TP22.1@2612.07,1452.92 2618.12,1446.87 TP22.1@2618.12,1482.6
STAT1: JP15.2 TP29.1 U1.4 | length 2200.9
  Top Layer w9.84: v1@2120.49,926.66 U1.4@2120.49,1020.76
  Top Layer w10: JP15.2@3674,525.56 3674,583.54 3699.5,609.04 TP29.1@3699.5,664.6
  Layer 3 w10: v1(2114.34,916.68) 2117.02,914 2117.02,903.33 2135.72,884.63 2138.82,884.63 2183.56,839.9 2183.56,568.54 2211.1,541 2552.31,541 2560.22,548.91 3016.59,548.91 3132.28,664.6 TP29.1@3699.5,664.6
STAT2: D5.1 TP31.1 U1.5 | length 2082
  Top Layer w9.84: U1.5@2140.18,1020.76 2140.18,948.56 2145.1,943.64 2145.1,924.44 2145.11,914.42 v1(2147.82,911.71)
  Top Layer w10: TP31.1@3698,791.01 TP31.1@3698,800.5 3796.5,702 D5.1@3828,702
  Layer 3 w10: v1(2147.82,911.71) 2147.82,911.29 2244,815.11 2244,685.27 2249.86,679.42 2411.74,679.42 2442.8,710.47 2443,710.47 2468.43,735.89 2568.74,735.89 2588.59,716.05 3539.85,716.05 3624.47,800.68 3697.82,800.68 TP31.1@3698,800.5
SW1: C12.1 D7.3 L1.1 L2.1 Q1.1 Q1.2 Q1.3 Q2.5-6-7-8 R14.2 TP18.1 U1.28 | length 1793.9
  Top Layer w10: L1.1@1859.96,2176.98 1924,2241.02 1924,2456 2051.01,2583.01 TP18.1@2051.01,2637
  Top Layer w20: v3@1985.42,1227.98 2003.67,1209.73 2056.36,1209.73
  Top Layer w40: C12.1@1958.93,1276.66 1988.14,1247.45 v3@1988.14,1231.77
  Layer 3 w40: v4(1502.02,1916.64) 1502.02,1929.14 1561.52,1988.64 1704.07,1988.64 1953.73,1738.98 1953.73,1372.76 1955.16,1371.33 1955.16,1251.41 1978.59,1227.98 v3(1984.34,1227.98)
  other v2: 1550.07,1801.2 1590.07,1801.2 1630.07,1801.2 1670.07,1801.2 1550.07,1841.2 1590.07,1841.2 1630.07,1841.2 1670.07,1841.2 1550.07,1881.2 1590.07,1881.2 1630.07,1881.2 1670.07,1881.2 1550.07,1921.2 1590.07,1921.2 1630.07,1921.2 1670.07,1921.2